# Altium PCB PCB1.PcbDoc
Units mil, origin at the board's own origin, x right, y up, seen from the top; angles counter-clockwise.
Board outline 2325 x 1570 mil, 2 copper layers (Top Layer, Bottom Layer); 17 components, 12 nets, 55 pads, 16 vias.
Unrouted connection lines stored in the file: 10.
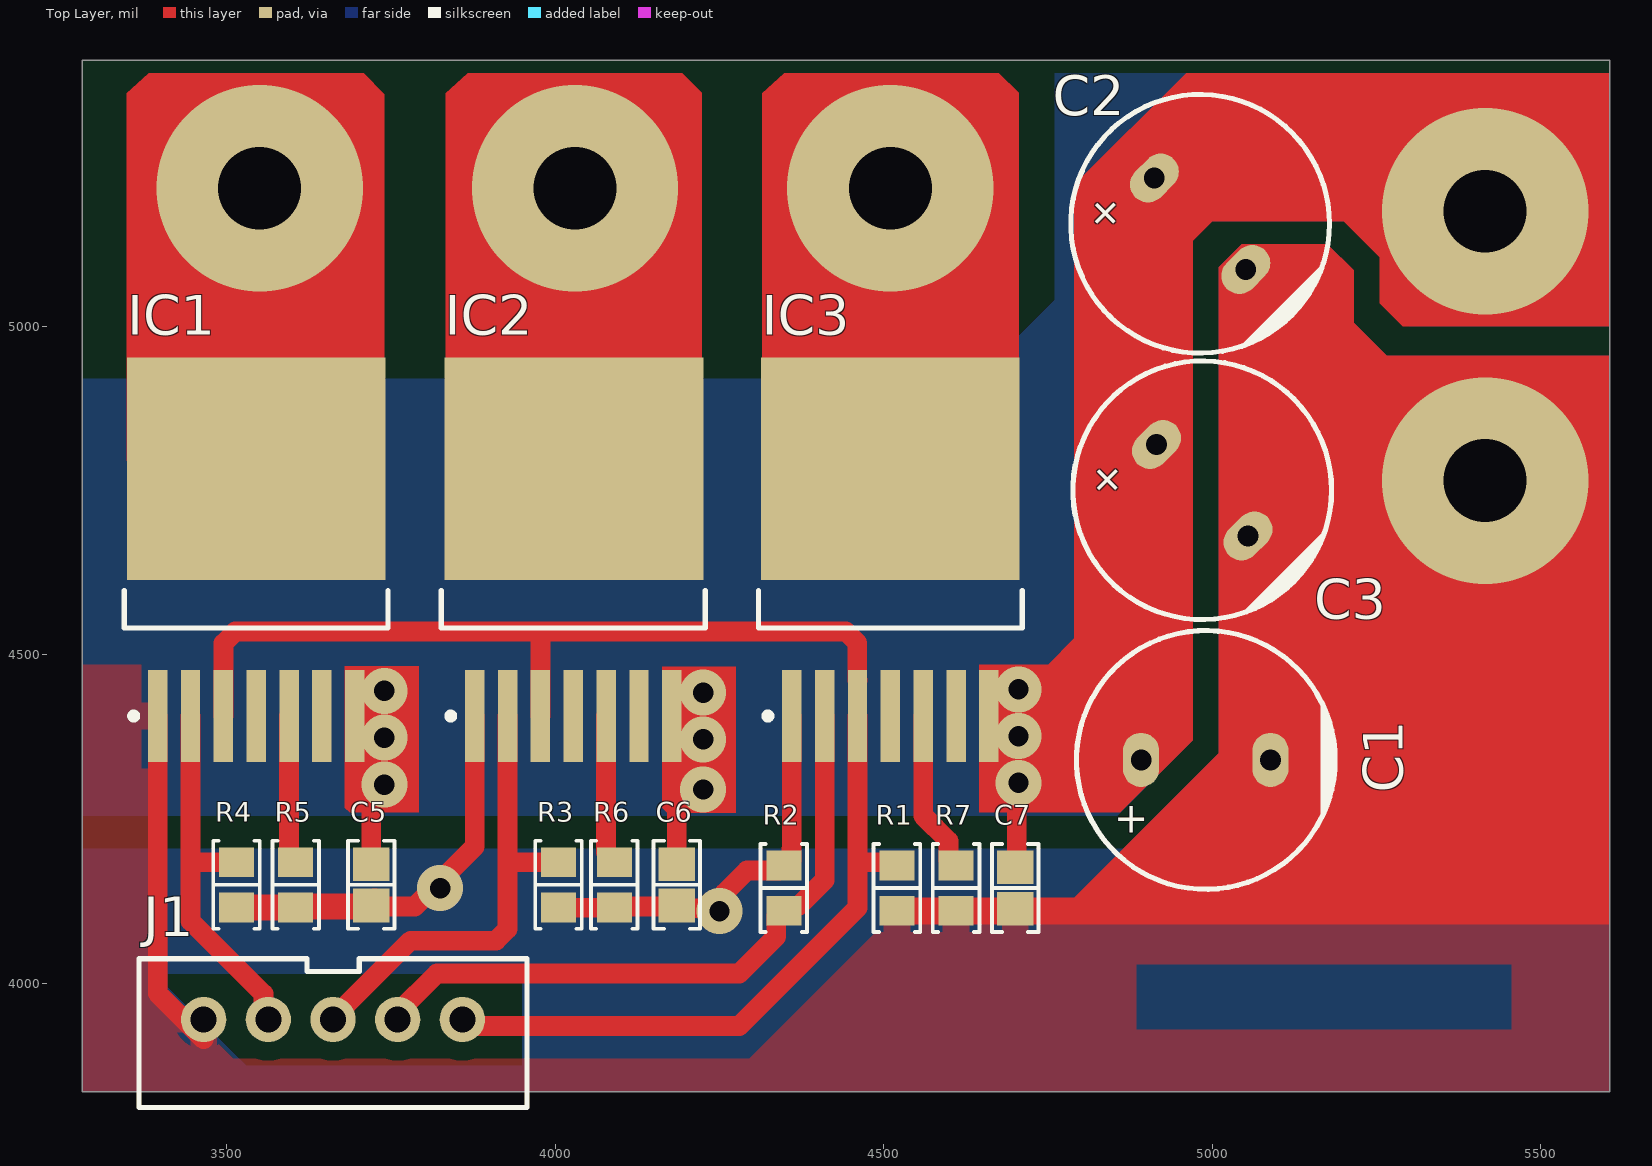
[diagram p0: Top Layer view]
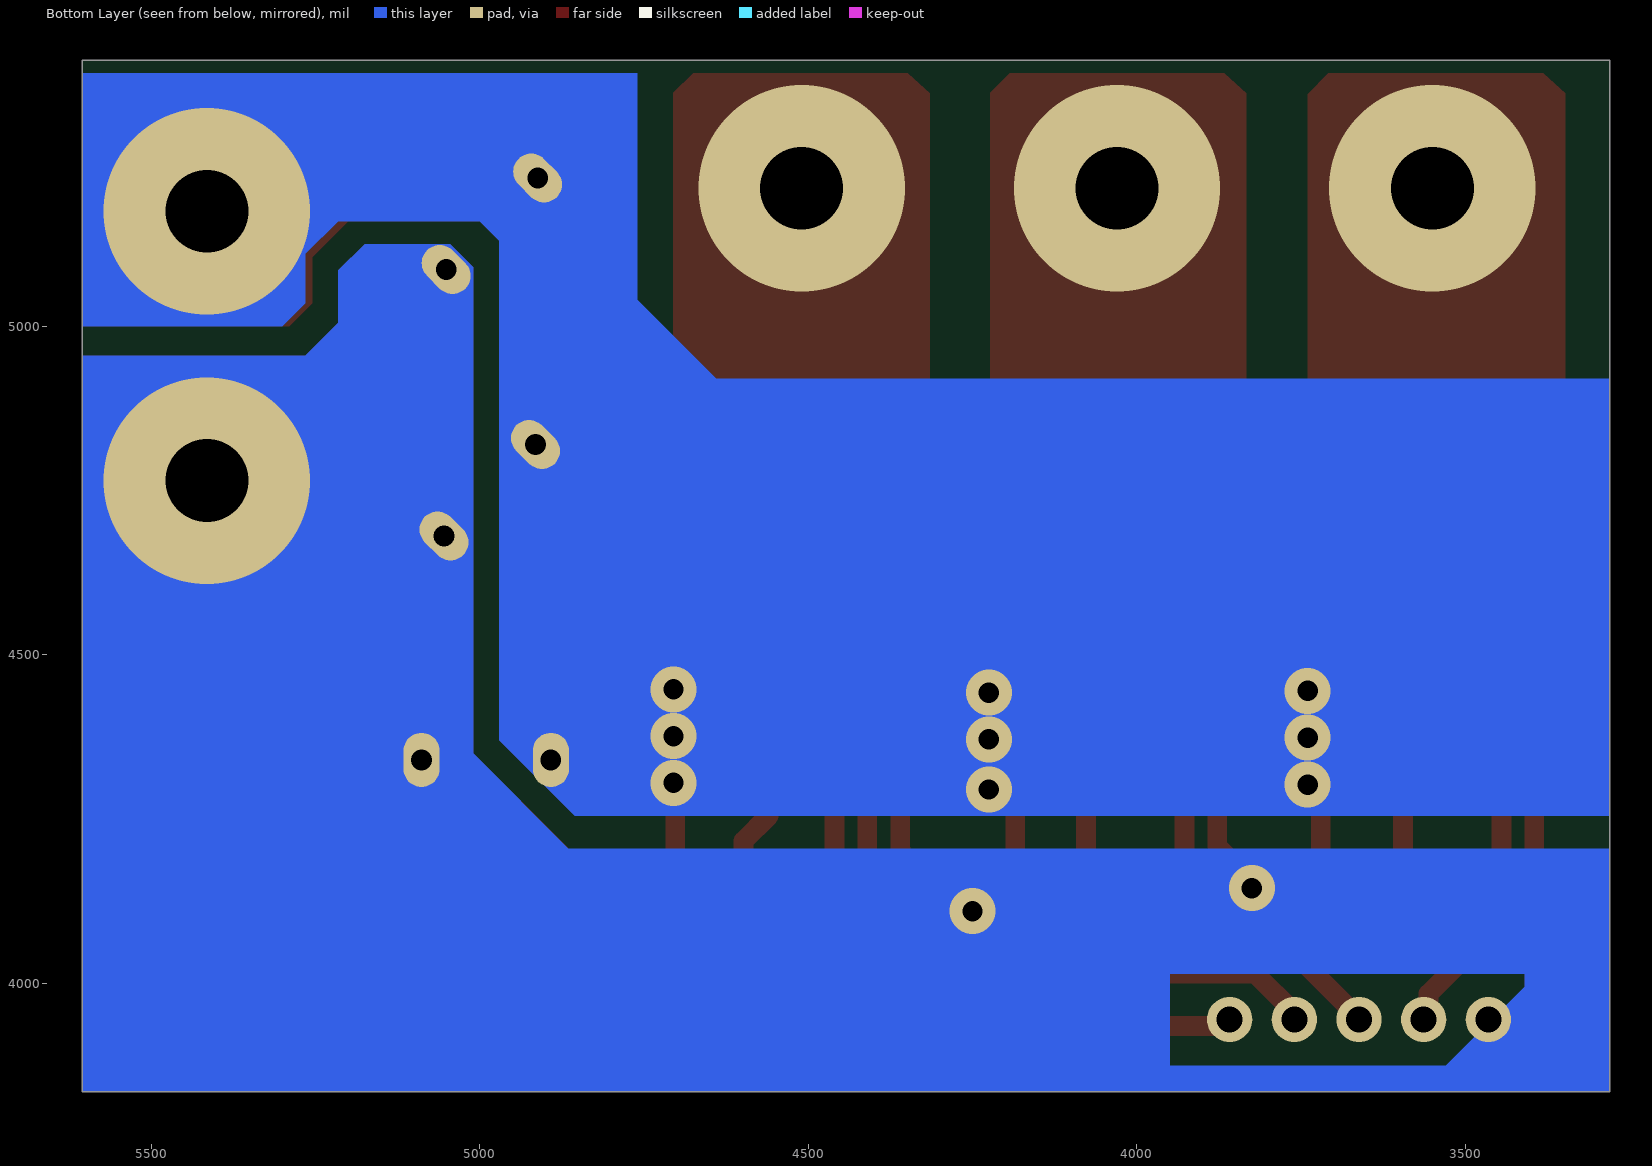
[diagram p1: Bottom Layer view, seen from below]
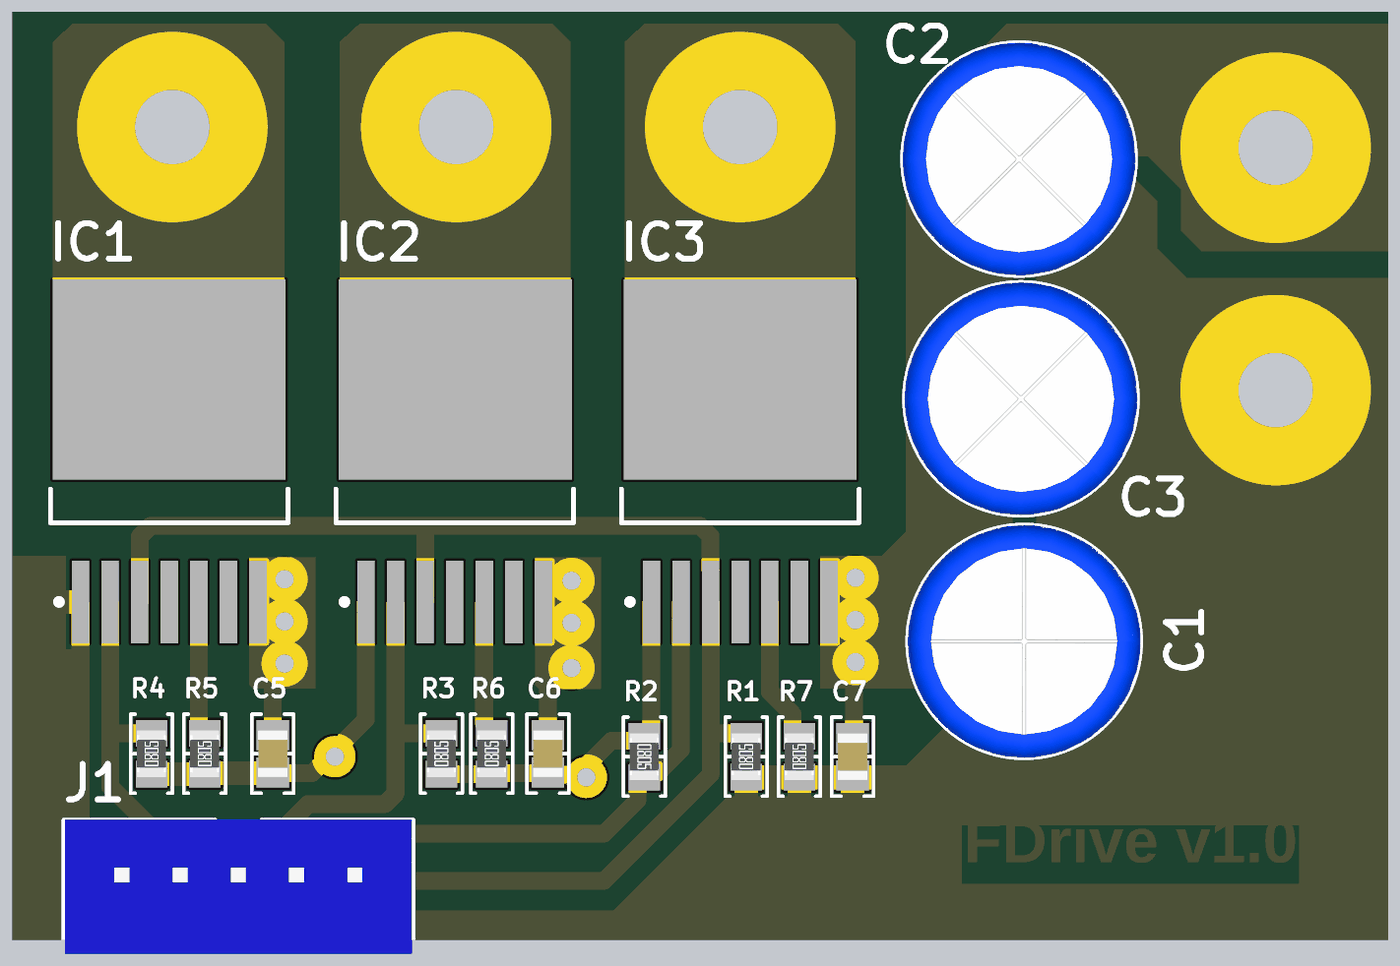
[diagram p2: 3D render of the assembled board from above, using the file's embedded part models]

## Layer stack, top to bottom
Top Solder: solder mask 0.4, Solder Resist, Dk 3.5
Top Layer: signal copper 1.4
Dielectric 1: dielectric 12.6, FR-4, Dk 4.8
Bottom Layer: signal copper 1.4
Bottom Solder: solder mask 0.4, Solder Resist, Dk 3.5

## Board outline
3280,3835 5605,3835 5605,5405 3280,5405

## Design rules (kind name [scope] priority, off if disabled: settings)
Clearance [All] p1: gap=28 ignorepadtopadclearanceinfootprint=FALSE except(0: Arc-Hole Track-Hole SMDPad-Hole THPad-Hole Via-Hole Fill-Hole Poly-Hole Region-Hole Text-Hole; 10: Arc-SMDPad Arc-THPad Arc-Text Track-SMDPad Track-THPad Track-Text SMDPad-SMDPad SMDPad-THPad SMDPad-Text THPad-THPad THPad-Text Via-Text Fill-Text Poly-Text Region-Text Text-Text; 20: Arc-Arc Arc-Track Arc-Via Track-Track Track-Via SMDPad-Via SMDPad-Fill SMDPad-Poly SMDPad-Region THPad-Via Via-Via)
PolygonConnect [All] p1: connectstyle=Relief reliefconductorwidth=40 reliefentries=4 polygonreliefangle="90 Angle" airgapwidth=10
RoutingVias [All] p1: holewidth=31 width=60 viastyle="Through Hole" minholewidth=30 minwidth=59 maxholewidth=500 maxwidth=500
SolderMaskExpansion [All] p1: expansion=4 istentingtop=FALSE
Width [All] p1: maxlimit=500 minlimit=10 preferedwidth=30
30 further rules are at their usual default settings.

## Components (designator, comment, footprint, x,y, rotation, side; value= is the part's Value field where it differs from the comment)
C1 "470 µF" "CAP TH ALPOLY D10.00mm S5.00mm H11.50mm" 4984.6,4750.4 r135 top
C2 "470 µF" "CAP TH ALPOLY D10.00mm S5.00mm H11.50mm" 4981.36,5155.86 r135 top
C3 "470 µF" "CAP TH ALPOLY D10.00mm S5.00mm H11.50mm" 4990,4340 r180 top
C5 "10000 pF" "CAP 0805_2012" 3720,4150 r90 top
C6 "10000 pF" "CAP 0805_2012" 4185,4150 r90 top
C7 "10000 pF" "CAP 0805_2012" 4700,4145 r90 top
IC1 "BTN8982TA" INF-PG-TO263-7-1_L#1 3545,4645 r90 top
IC2 "BTN8982TA" INF-PG-TO263-7-1_L#2 4027.5,4645 r90 top
IC3 "BTN8982TA" INF-PG-TO263-7-1_L#1 4510,4645 r90 top
J1 "JST_XH_5_VERT" JST-XH-5-PTH-VERT 3661.85,3945 r180 top
R1 "10k" "RES 0805_2012" 4520,4145 r90 top
R2 "10k" "RES 0805_2012" 4348,4145 r270 top
R3 "10k" "RES 0805_2012" 4005,4150 r90 top
R4 "10k" "RES 0805_2012" 3515,4150 r90 top
R5 "4.7K" "RES 0805_2012" 3605,4150 r90 top
R6 "4.7K" "RES 0805_2012" 4090,4150 r90 top
R7 "4.7K" "RES 0805_2012" 4610,4145 r90 top

## Footprints (in the part's own frame and the unit in brackets; to place one, negate y for a bottom-side part, rotate by r counter-clockwise, add the part's x,y. Pads: shape width x height; smd on the part's side, far side on the other; paste and mask are expansions set on the pad)
"CAP 0805_2012" [mm] "Chip Capacitor, 2-Leads, Body 2.00x1.20mm, IPC Medium Density"
  rect 1.3x1.4 smd: 1(-0.8,0) 2(0.8,0)
  silkscreen extent -1.7,-0.9 1.7,0.9, body extent -1,-0.64 1,0.64, height 1.26
"CAP TH ALPOLY D10.00mm S5.00mm H11.50mm" [mm] "10.00mm Diameter 11.50mm Lead Spacing Aluminum - Polymer Capacitors Radial, Can"
  oval 1.4x2.1 hole 0.8: 1(2.5,0) 2(-2.5,0)
  silkscreen extent -5,-5 5,5, body extent -5.01,-5 5,5, height 11.5
INF-PG-TO263-7-1_L#1 [mm] "DPAK, 8-Leads, Body 10x9.25mm, Pitch 1.27mm, IPC High Density"
  rect 3.55x0.75 smd: 1(-6.05,3.81) 2(-6.05,2.54) 3(-6.05,1.27) 4(-6.05,0) 5(-6.05,-1.27) 6(-6.05,-2.54) 7(-6.05,-3.81)
  rect 8.6x10 smd: 8(3.5,0)
  silkscreen extent -6.17,-5.1 -1.2,5.1, body extent -2.65,-5.1 6.8,5.1, height 4.4
INF-PG-TO263-7-1_L#2 [mm] "DPAK, 8-Leads, Body 10x9.25mm, Pitch 1.27mm, IPC High Density"
  rect 3.55x0.75 smd: 1(-6.05,3.81) 2(-6.05,2.54) 3(-6.05,1.27) 4(-6.05,0) 5(-6.05,-1.27) 6(-6.05,-2.54) 7(-6.05,-3.81)
  rect 8.6x10 smd: 8(3.5,-0.025)
  silkscreen extent -6.17,-5.1 -1.2,5.1, body extent -2.65,-5.1 6.8,5.1, height 4.4
JST-XH-5-PTH-VERT [mm]
  round 1.75 hole 1: 1(-5,0) 2(-2.5,0) 3(0,0) 4(2.5,0) 5(5,0)
  silkscreen extent -7.5,-2.36 7.5,3.4, body extent -7.45,-2.37 7.45,3.38, height 7
"RES 0805_2012" [mm] "Chip Resistor, 2-Leads, Body 2.00x1.25mm, IPC Medium Density"
  rect 1.15x1.35 smd: 1(-0.875,0) 2(0.875,0)
  silkscreen extent -1.7,-0.9 1.7,0.9, body extent -1,-0.62 1,0.63, height 0.6

## Part data
C1 C2 C3: library part APSC160ELL471MJB5S, "CAP ALUM POLY 470UF 20% 16V T/H", Device Package="Radial, Can", ESR (Equivalent Series Resistance)=10mOhm, Lifetime @ Temp.="2000 Hrs @ 105°C", Manufacturer="United Chemi-Con", Operating Temperature="-55°C ~ 105°C", Ripple Current @ High Frequency="6.1 A @ 100 kHz", Supplier Part Number 1=565-3234-ND, Tolerance=±20%, Voltage - Rated="16 V", Applications="General Purpose", Capacitance="470 µF", ComponentLink1Description=Datasheet, ComponentLink1URL=http://www.chemi-con.co.jp/cgi-bin/CAT_DB/SEARCH/cat_db_al.cgi?e=e&j=p&pdfname=psc, ComponentLink2Description="DigiKey Link", ComponentLink2URL=https://www.digikey.com/en/products/detail/united-chemi-con/APSC160ELL471MJB5S/1826698, Height - Seated (Max)="0.453\" (11.50mm)", lastupdated="4/5/2026 21:04:37", Lead Spacing="0.197\" (5.00mm)", Lifecycle Status=Active, Minimum Order=1, Mounting Type="Through Hole", Package / Case="Radial, Can", packaging=Bulk, Part Number=APSC160ELL471MJB5S, Part Status=Active, partid=3587, price=0.89, series=NPCAP™-PSC, Size / Dimension="0.394\" Dia (10.00mm)", Supplier 1=DigiKey, Type=Polymer
C5 C6 C7: library part C0805C103K5RACTU, "CAP CER 10000PF 50V X7R 0805", Capacitance=100nF, Device Package="0805 (2012 Metric)", Manufacturer=KEMET, Operating Temperature="-55°C ~ 125°C", Supplier Part Number 1=399-C0805C103K5RACTUCT-ND, Temperature Coefficient=X7R, Tolerance=±10%, Voltage - Rated=50V, Applications="Bypass, Decoupling", ComponentLink1Description=Datasheet, ComponentLink1URL=https://api.kemet.com/component-edge/download/datasheet/C0805C103K5RACTU.pdf, ComponentLink2Description="DigiKey Link", ComponentLink2URL=https://www.digikey.com/en/products/detail/kemet/C0805C103K5RACTU/411157, lastupdated="4/6/2026 19:33:13", Lifecycle Status=Active, Minimum Order=1, Mounting Type="Surface Mount, MLCC", Package / Case="0805 (2012 Metric)", packaging=TapeAndReel, Part Number=C0805C103K5RACTU, Part Status=Active, partid=74789, price=0.01, series="SMD Comm X7R", Size / Dimension="0.079\" L x 0.049\" W (2.00mm x 1.25mm)", Supplier 1=DigiKey, Thickness (Max)="0.035\" (0.88mm)"
IC1 IC2 IC3: library part CMP-1114-00014-1, "High Current PN Half Bridge, 5.5 to 40 V, 7 uA Iq, PG-TO263-7, Reel, Green", Manufacturer=Infineon, Operating Range="5.5 to 40 V", ComponentLink1Description="Manufacturer URL", ComponentLink1URL=http://www.infineon.com/, ComponentLink2Description=Datasheet, ComponentLink2URL=http://www.infineon.com/dgdl/BTN8982TA-Data-Sheet-rev10-Infineon.pdf?folderId=db3a30431ff98815012060aedcd46179&fileId=db3a30433fa9412f013fbe32289b7c17, ComponentLink3Description="Package Specification", ComponentLink3URL=http://www.infineon.com/dgdl/BTN8982TA-Data-Sheet-rev10-Infineon.pdf?folderId=db3a30431ff98815012060aedcd46179&fileId=db3a30433fa9412f013fbe32289b7c17&ack=t, DatasheetVersion="Rev. 1.0", Diagnosis="OT, OC-failure flag, current sense", Green=TRUE, Group=NovalithIC, Halogen-free=TRUE, ID(lim)="77 A", ID(lim) (min)="55 A", Inhibit=TRUE, Iq (typ)="7 uA", Mounting=SMT, Mounting Technology="Surface Mount", PackageDescription="7-Pin Plastic (Green) Transistor Single Outline Package, 9.25 x 10 mm Body, 1.27 mm Pitch", PackageReference=PG-TO263-7-1, PackageVersion=May-07, Packing=Reel, PartNumber=BTN8982TA, Protect="UV, OT, OC", RDS (on)=10
J1: Manufacturer="JST Sales America, Inc.", PartNumber=B5B-XH-A(LF)(SN), Mounting Technology="Through Hole", PackageReference=JST-XH
R1 R2 R3 R4 R5 R6 R7: library part CRGP0805F470R, "RES 470 OHM 1% 1/3W 0805", Part Number=CRGP0805F470R

## Via types
v1: diameter 70, hole 31, Top Layer to Bottom Layer, 11 vias
v2: diameter 314, hole 126, Top Layer to Bottom Layer, 5 vias

## Nets (pads, with @x,y where several pads share a name; then routed paths per layer and width w, separated by ;. In a path a pad name is that pad's centre, name@x,y a point inside that pad or via, vN(x,y) a via of type N, cw(c..) or ccw(c..) an arc to the next point about the centre after c; other vN are vias at no path point)
EN: IC1.3 IC2.3 IC3.3 J1.1 R1.2 | length 2306.5
  Top Layer w30: IC1.3 3495.24,4407.05 3495.24,4517.43 3513.31,4535.5 3969.5,4535.5 ; J1.1@3858.43,3935 4280,3935 4460,4115 4460,4184.45 ; IC2.3 3977.5,4527.5 3969.5,4535.5 ; IC3.3 4460,4184.45 ; IC3.3@4460,4461.46 4459.76,4461.69 4459.76,4517.93 4442.19,4535.5 3969.5,4535.5 ; R1.2@4520,4184.45 4460,4184.45
GND: C1.2 C2.2 C3.2 C5.1 C6.1 C7.1 IC1.1 IC2.1 IC3.1 J1.5 R1.1 R2.1 R3.1 R4.1 R5.1 R6.1 R7.1 | length 2011.8
  Top Layer w30: IC1.1 3395,3985 J1.5@3465.2,3914.8 ; C5.1@3718.52,4117.03 3786.2,4117.03 3814.18,4145 v1(3825,4145) 3825,4155.82 3877.5,4208.32 IC2.1 ; R3.1 4005.55,4115 4089.45,4115 R6.1 4091.48,4117.03 C6.1@4179.07,4117.03 ; C6.1 4186.97,4118.5 4191.22,4114.25 4245.75,4114.25 v1(4250,4110) 4257.65,4117.65 4257.65,4137.65 4291.81,4171.81 4340.36,4171.81 R2.1 4351.94,4179.45 4359.57,4187.09 4359.57,4204.23 4360,4204.66 IC3.1 ; R1.1 4525.55,4105 4604.45,4105 R7.1 4615.55,4105 C7.1@4700,4105
  Top Layer w40: R4.1 R5.1 3606.48,4117.03 C5.1@3718.52,4117.03 ; C5.1 C5.1@3725.59,4124.09 ; C7.1 4703.5,4110 4771.92,4110
  other v2: 5415,4765
IN1: IC1.2 J1.4 R4.2 | length 575.9
  Top Layer w30: IC1.2 3445,4184.45 ; R4.2@3510,4184.45 3445,4184.45 ; J1.4 3555.98,3952.44 3555.98,3984.02 3445,4095 3445,4184.45
IN2: IC2.2 J1.3 R3.2 | length 737.4
  Top Layer w30: J1.3@3661.57,3935 3661.57,3945.53 3681.02,3964.97 3681.02,3966.02 3780,4065 3909.93,4065 3927.5,4082.57 3927.5,4180 ; IC2.2 3927.5,4180 ; R3.2 3931.95,4184.45 3927.5,4180
IN3: IC3.2 J1.2 R2.2 | length 1004.1
  Top Layer w30: J1.2 3760.28,3955.28 3820,4015 4280,4015 4336.43,4071.43 4336.43,4102.91 4344.06,4110.55 R2.2 ; R2.2@4352.64,4118.19 4371.31,4118.19 4410,4156.88 IC3.2
NetIC1_4: IC1.4 IC1.8 | length 7.1
  Top Layer w20: IC1.8 IC1.8@3550,4787.8
  other v2: 3550.2,5210.07
NetIC1_5: IC1.5 R5.2 | length 222.4
  Top Layer w30: R5.2@3595,4184.45 IC1.5
NetIC2_4: IC2.4 IC2.8
  other v2: 4030.1,5210.07
NetIC2_5: IC2.5 R6.2 | length 207.5
  Top Layer w30: R6.2@4077.26,4199.45 4077.26,4406.57 IC2.5
NetIC3_4: IC3.4 IC3.8
  other v2: 4510,5210.07
NetIC3_5: IC3.5 R7.2 | length 239.2
  Top Layer w30: IC3.5 4560,4255 4598.43,4216.57 4598.43,4187.09 4600.05,4185.46 R7.2@4601.35,4185.46
VDC: C1.1 C2.1 C3.1 C5.2 C6.2 C7.2 IC1.7 IC2.7 IC3.7 | length 361
  Top Layer w30: C5.2@3715,4181.5 3720,4186.5 3720,4271.68 3740,4291.68 v1(3740,4302.5) ; C6.2 4185,4275 ; v1@4225,4284.18 v1(4225,4295) ; C7.2@4702.5,4180.75 4702.5,4302.5 v1(4705,4305)
  other v1: 4225,4371.25 3740,4373.75 4705,4376.25 4225,4442.5 3740,4445 4705,4447.5
  other v2: 5415,5175
pads on no net: IC1.6 IC2.6 IC3.6

## Polygon pours and split planes (outlines as drawn)
GND on Top Layer "GND_L01_P000" (solid, remove dead copper, pour order 0): 5605,4120 4530,4120 4295,3885 3510,3885 3410,3985 3410,4485 3280,4485 3280,3835 5605,3835

## Other copper
Top Layer:
  region net VDC: 5605,5000 5290,5000 5255,5035 5255,5105 5200,5160 5000,5160 4970,5130 4970,4370 4860.04,4260.04 4645,4260.04 4645,4485 4750,4485 4790,4525 4790,5215 4960,5385 5605,5385
  region net NetIC3_4: 4315,4795 4315,5354.57 4348.32,5385 4675,5385 4705,5355 4705,4795
  region net VDC: 3680,4482.5 3792,4482.5 3792,4260 3687.5,4260 3680,4267.5
  region net GND: 5605,4955 5265,4955 5215,5005 5215,5085 5175,5125 5045,5125 5010,5090 5010,4350 4790,4130 4740,4130 4545,4130 4545,4090 5605,4090
  region net VDC: 4645,4485 4757,4485 4757,4262.5 4652.5,4262.5 4645,4270
  region net VDC: 4163,4482 4275,4482 4275,4259.5 4170.5,4259.5 4163,4267
  region net NetIC1_4: 3348.34,4795 3348.34,5354.57 3381.66,5385 3708.34,5385 3740,5353.34 3740,4795
  region net NetIC2_4: 3833.34,4795 3833.34,5354.57 3866.66,5385 4193.34,5385 4223.34,5355 4223.34,4795
Bottom Layer:
  region net GND: 3410,4050 3410,3995 3530,3875 3950,3875 3950,4050 5605,4050 5605,3835 3280,3835 3280,4050
  region net GND: 5605,4955 5265,4955 5215,5005 5215,5085 5175,5125 5045,5125 5010,5090 5010,4350 4865,4205 3280,4205 3280,4015 5605,4015
  region net VDC: 5605,5000 5300,5000 5265,5035 5265,5110 5215,5160 5000,5160 4970,5130 4970,4370 4855,4255 3280,4255 3280,4920 4640,4920 4760,5040 4760,5385 5605,5385
Multi-Layer:
  text "FDrive v1.0" at 4867.5,3920 h120

## Text inside footprints (layer, text, board x,y; h text height)
C1: Top Overlay "+" at 4884.38,4772.67 h78.74 r135
C2: Top Overlay "+" at 4881.14,5178.13 h78.74 r135
C3: Top Overlay "+" at 4903.39,4284.88 h78.74 r180